# Altium PCB shifter_V2.PcbDoc (part 1 of 2)
Units mil, origin at the board's own origin, x right, y up, seen from the top; angles counter-clockwise.
Board outline 1953.14 x 1638.38 mil, 4 copper layers (Top Layer, Mid-Layer 1, Mid-Layer 2, Bottom Layer); 116 components, 104 nets, 449 pads, 247 vias.
Unrouted connection lines stored in the file: 152.
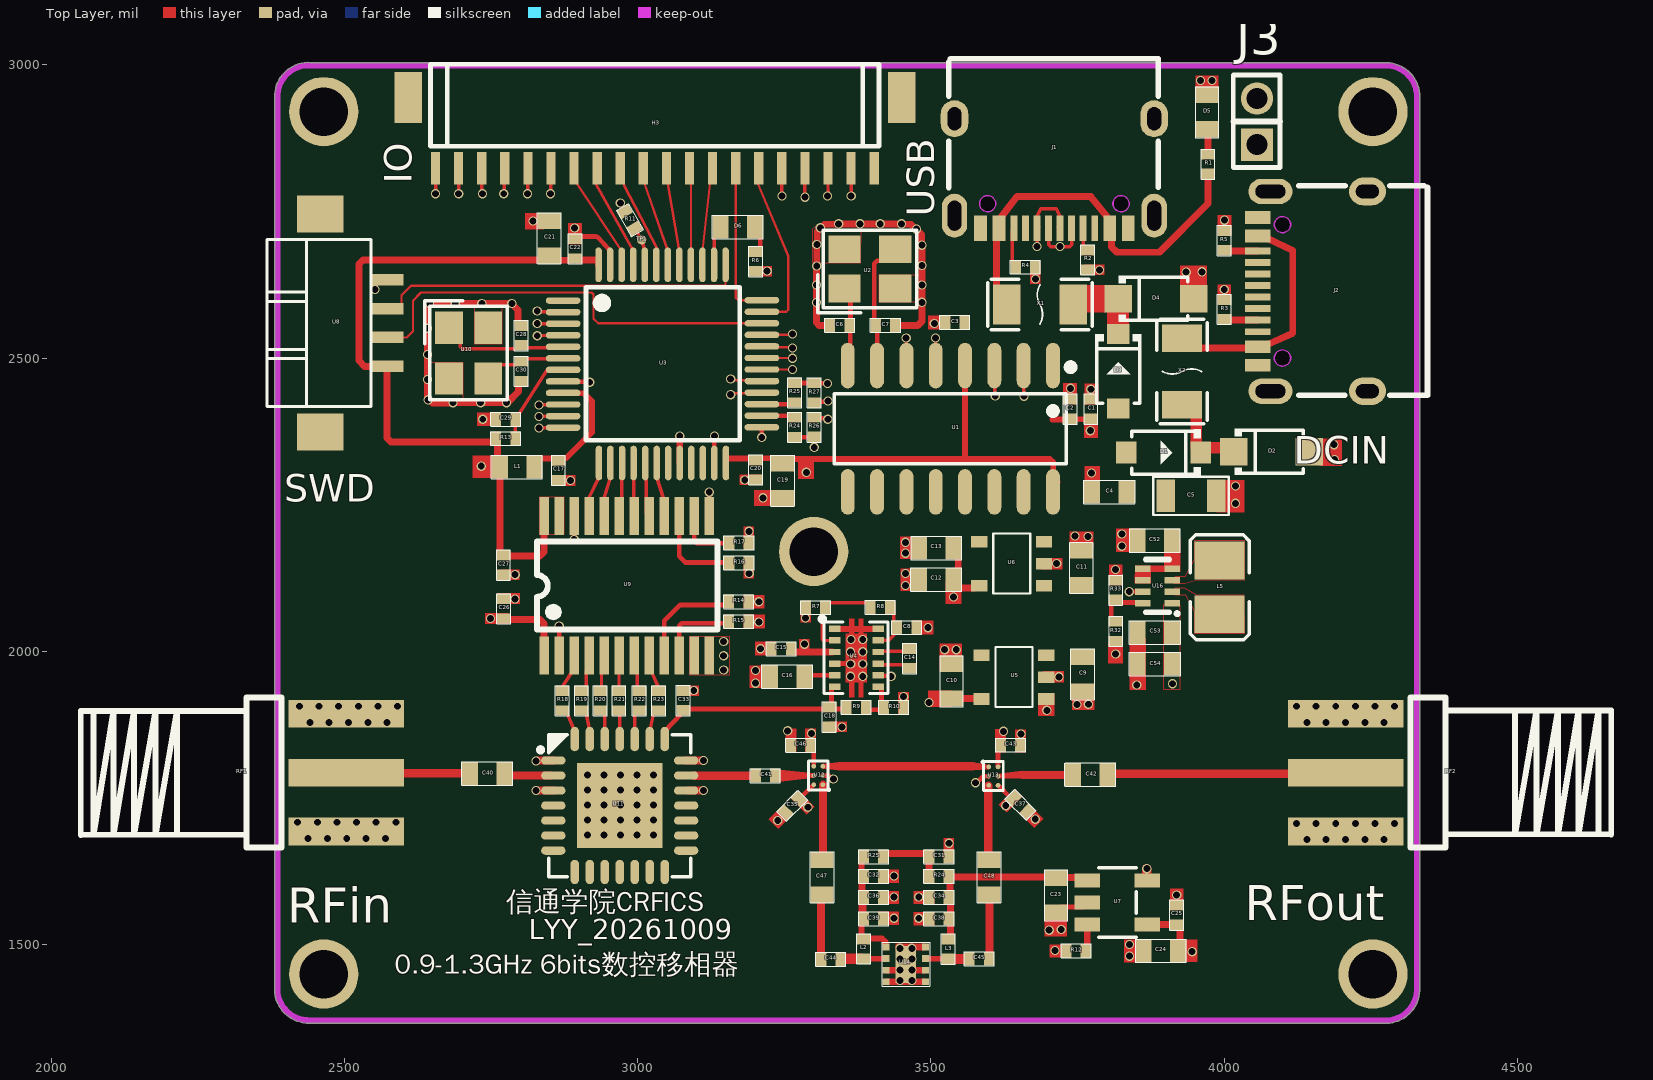
[diagram p0: Top Layer view]
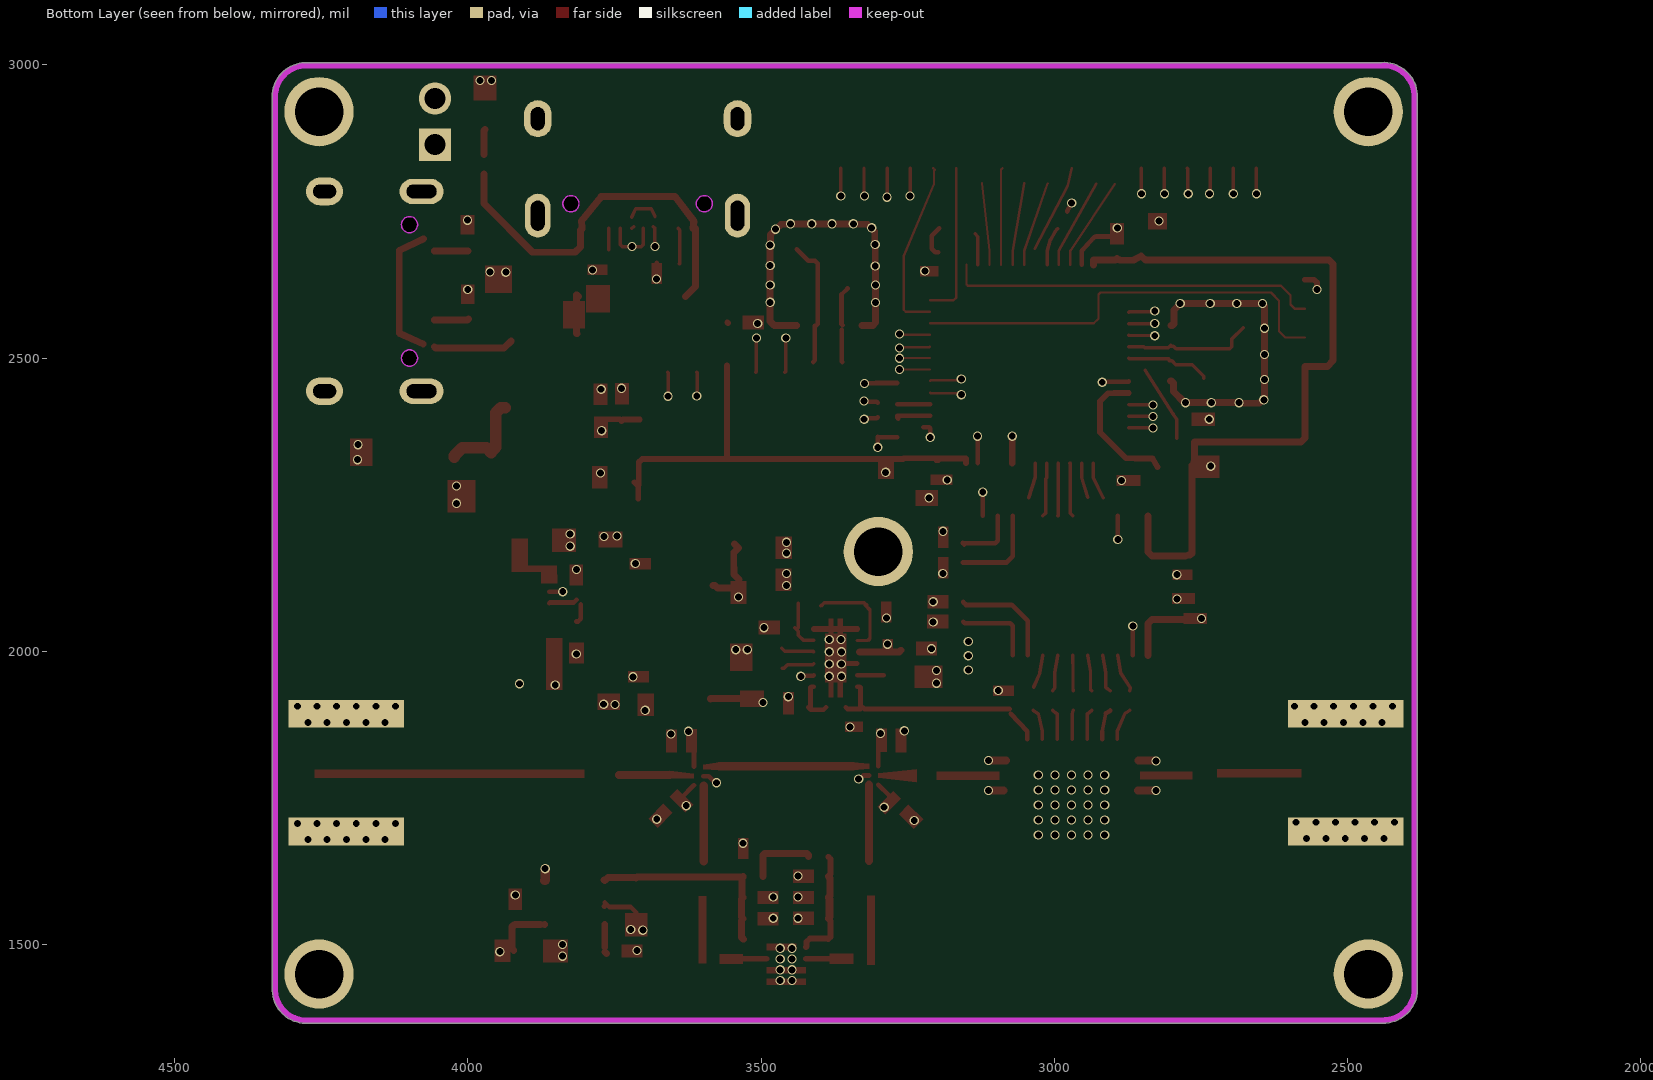
[diagram p1: Bottom Layer view, seen from below]
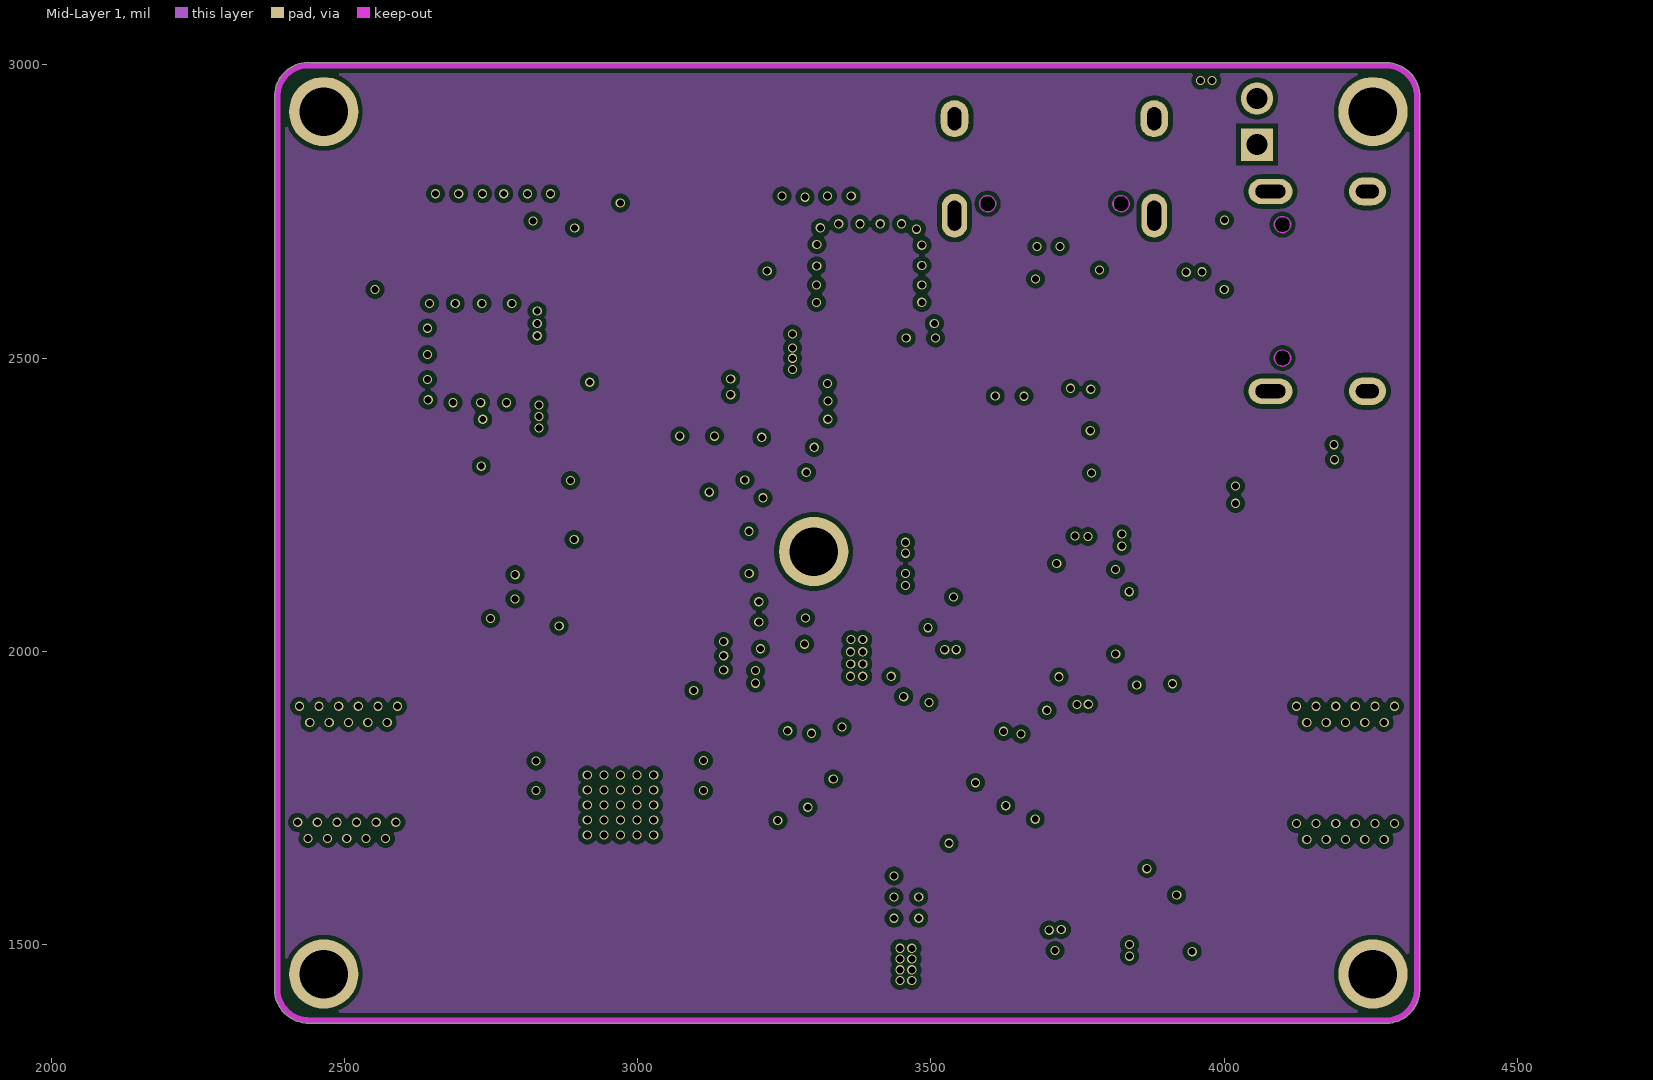
[diagram p2: Mid-Layer 1]
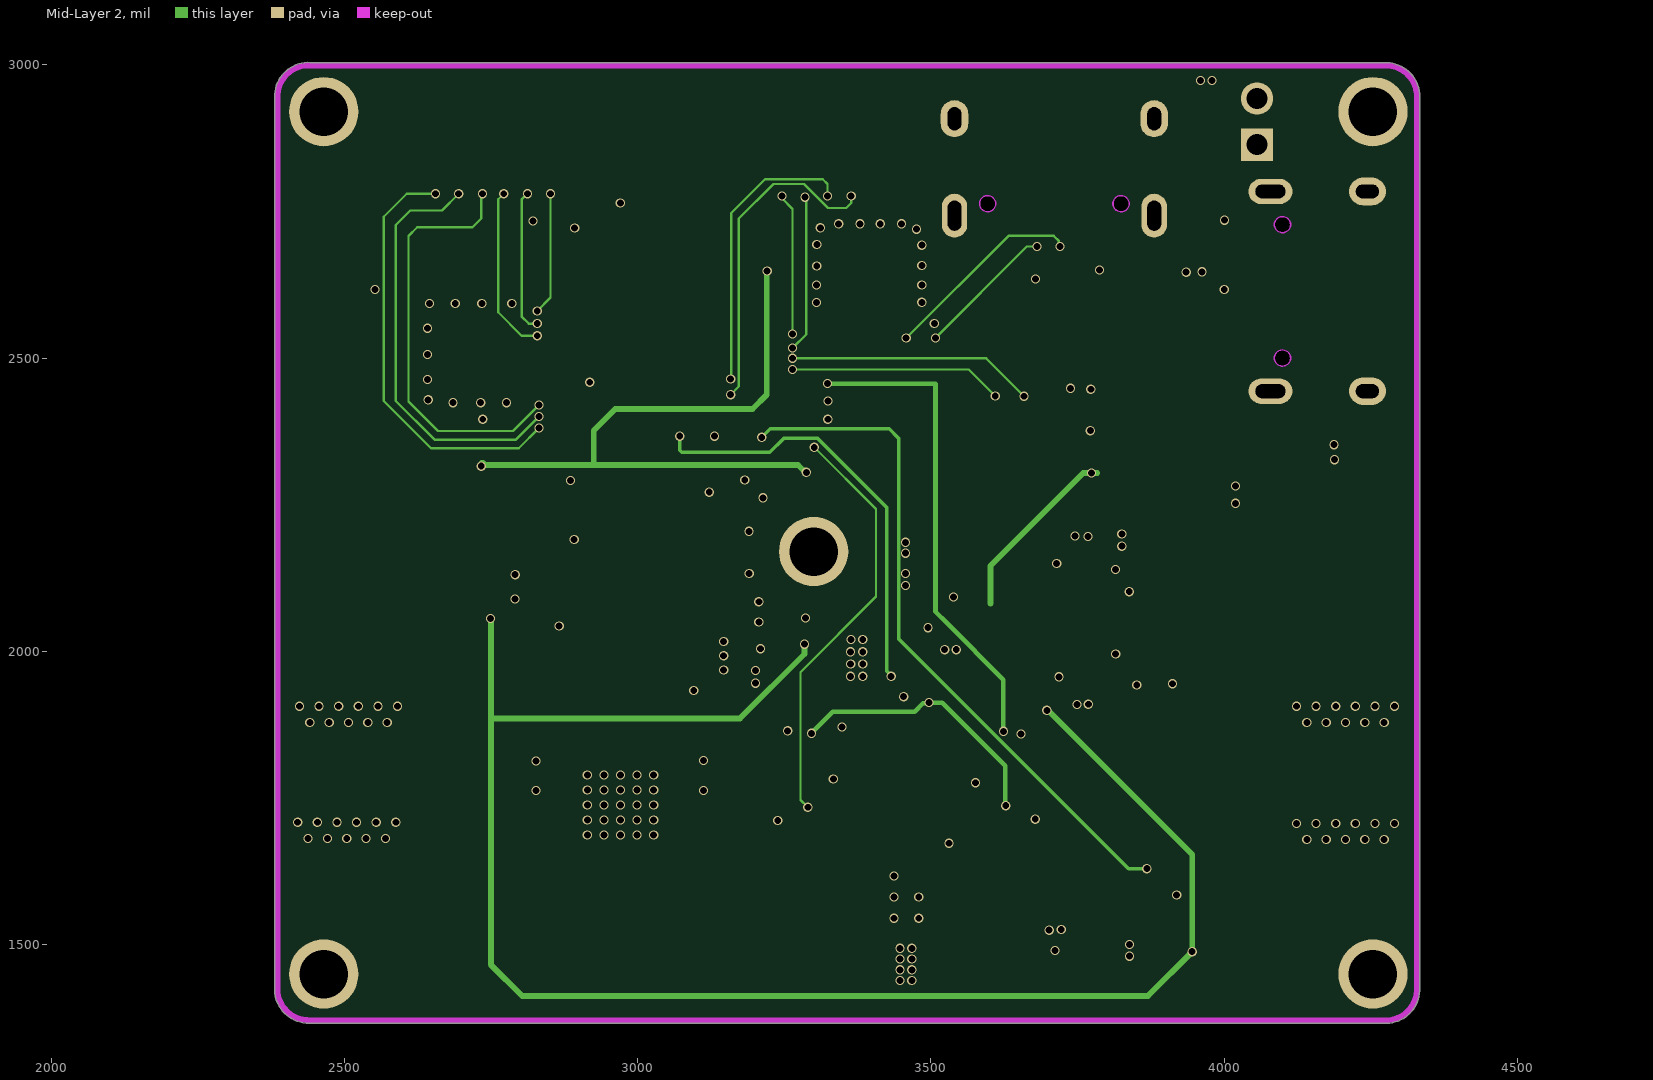
[diagram p3: Mid-Layer 2]

## Layer stack, top to bottom
Top Solder: solder mask 0.4, Solder Resist, Dk 3.5
Top Layer: signal copper 1.4
Dielectric 1: dielectric 12.6, FR-4, Dk 4.8
Mid-Layer 1: signal copper 1.4
Dielectric3: dielectric 12.6, FR-4, Dk 4.8
Mid-Layer 2: signal copper 1.4
Dielectric2: dielectric 12.6, FR-4, Dk 4.8
Bottom Layer: signal copper 1.4
Bottom Solder: solder mask 0.4, Solder Resist, Dk 3.5

## Board outline
2380.62,1426.85 ccw(c2438.63,1423.93) 2433.39,1366.08 2435.11,1365.77 4271.71,1365.77 4272.62,1365.64 ccw(c4275.54,1423.66) 4333.55,1420.73 4333.56,1420.98 4333.56,2941.91 4333.76,2945.74 ccw(c4275.68,2945.74) 4282.76,3003.39 4280.31,3004.03 2441.57,3004.03 ccw(c2438.77,2946.01) 2380.82,2949.99 2380.64,2948.68

## Design rules (kind name [scope] priority, off if disabled: settings)
Clearance Clearance_1 [InNamedPolygon('NONET_L-01_P-TOP')] p1: gap=22.83 ignorepadtopadclearanceinfootprint=FALSE except(0: Arc-Text Arc-Hole Track-Text Track-Hole SMDPad-Text SMDPad-Hole THPad-Text THPad-Hole Via-Text Via-Hole Fill-Text Fill-Hole Poly-Text Poly-Hole Region-Text Region-Hole Text-Text Text-Hole; 15.75: Arc-Arc Arc-Track Arc-SMDPad Arc-THPad Arc-Via Track-Track Track-SMDPad Track-THPad Track-Via SMDPad-SMDPad SMDPad-THPad SMDPad-Via THPad-THPad THPad-Via Via-Via; 27.56: Arc-Fill Arc-Poly Arc-Region Track-Fill Track-Poly Track-Region)
Clearance Clearance_2 [InNamedPolygon('NONET_L-01_P-002')] p2: gap=27.56 ignorepadtopadclearanceinfootprint=FALSE except(0: Arc-Hole Track-Hole SMDPad-Hole THPad-Hole Via-Hole Fill-Hole Poly-Hole Region-Hole Text-Hole; 11.81: Arc-Via Track-Via SMDPad-Via THPad-Via Via-Via)
Clearance GND_Bottom [InNamedPolygon('GND_Bottom')] p3: gap=23.62 ignorepadtopadclearanceinfootprint=TRUE
Clearance Ch341_3V3 [InNamedPolygon('CH341_3V3')] p4: gap=19.68 ignorepadtopadclearanceinfootprint=TRUE
Clearance VSS [InNamedPolygon('VSS')] p5: gap=7.87 ignorepadtopadclearanceinfootprint=TRUE except(23.62: Arc-Fill Arc-Poly Arc-Region Track-Fill Track-Poly Track-Region Fill-Fill Fill-Poly Fill-Region Poly-Poly Poly-Region Region-Region)
Clearance GND [InNamedPolygon('GND_Ploy')] p6: gap=15.75 ignorepadtopadclearanceinfootprint=TRUE except(31.5: Arc-Fill Arc-Poly Arc-Region Track-Fill Track-Poly Track-Region Fill-Fill Fill-Poly Fill-Region Poly-Poly Poly-Region Region-Region)
Clearance DC_GND [InNamedPolygon('DC_Ploy')] p7: gap=15.75 ignorepadtopadclearanceinfootprint=TRUE except(31.5: Arc-Fill Arc-Poly Arc-Region Track-Fill Track-Poly Track-Region Fill-Fill Fill-Poly Fill-Region Poly-Poly Poly-Region Region-Region)
Clearance LNA [InNamedPolygon('LNA')] p8: gap=4.02 ignorepadtopadclearanceinfootprint=TRUE except(7.87: Arc-Arc Arc-Track Track-Track SMDPad-Fill SMDPad-Poly SMDPad-Region THPad-Fill THPad-Poly THPad-Region; 31.5: Arc-Fill Arc-Poly Arc-Region Track-Fill Track-Poly Track-Region Via-Fill Via-Poly Via-Region Fill-Fill Fill-Poly Fill-Region Poly-Poly Poly-Region Region-Region)
Clearance Ploy [InPolygon] p9: gap=7.87 ignorepadtopadclearanceinfootprint=TRUE
Clearance Diff [InNetClass('Diff')] p10: gap=6 ignorepadtopadclearanceinfootprint=TRUE
Clearance [All] p11: gap=3.94 ignorepadtopadclearanceinfootprint=TRUE except(4.02: SMDPad-SMDPad; 7.99: SMDPad-THPad)
ComponentClearance [All] p1: gap=3.94 collisioncheckmode=3 verticalgap=3.94 showdistances=FALSE donotcheckwithout3dbody=TRUE
DiffPairsRouting [All] p1: maxlimit=393.7 minlimit=3.94 mostfreqgap=7 toplayer_minwidth=5.04 toplayer_maxwidth=40 toplayer_prefwidth=16.6 midlayer1_minwidth=5.04 midlayer1_maxwidth=40 midlayer1_prefwidth=16.6 midlayer2_maxgap=10 midlayer2_minwidth=5.04 midlayer2_maxwidth=15 midlayer2_prefwidth=11.42 bottomlayer_minwidth=5.04 bottomlayer_maxwidth=40 bottomlayer_prefwidth=16.6 maxuncoupledlength=500
HoleSize [All] p1: absolutevalues=TRUE maxlimit=196.85 minlimit=1 maxpercent=80.000 minpercent=20.000
HoleToHoleClearance [All] p1: gap=0 allowstackedmicrovias=TRUE
MatchedLengths [InNetClass('DRM')] p1: tolerance=50 checknetsindiffpair=FALSE checkdiffpairvsdiffpair=TRUE checkxsignals=TRUE checkothers=TRUE
MinimumSolderMaskSliver [All] p1: minsoldermaskwidth=0
PlaneConnect [All] p1: planeconnectstyle=Direct reliefexpansion=20 reliefentries=4 reliefconductorwidth=10 reliefairgap=10
PolygonConnect [All] p1: connectstyle=Direct reliefconductorwidth=10 reliefentries=4 polygonreliefangle="90 Angle" airgapwidth=10
RoutingVias [All] p1: holewidth=28 width=50 viastyle="Through Hole" minholewidth=7.87 minwidth=3.94 maxholewidth=94.49 maxwidth=196.85
SilkToSilkClearance [All] p1: silktosilkclearance=0
SilkToSolderMaskClearance [IsPad] p1: minsilkscreentomaskgap=0 clearancetoexposedcopper=TRUE
SolderMaskExpansion [IsVia] p1: expansion=4 istentingtop=TRUE
SupplyNets "Schematic Supply Nets_1" [InNet('GND')] p1: voltage=0.000
SupplyNets "Schematic Supply Nets" [InNet('3V3')] p2: voltage=0.000
Width [All] p1: maxlimit=196.85 minlimit=3.94 preferedwidth=3.94 midlayer1_maxwidth=78.74 midlayer2_maxwidth=10 bottomlayer_maxwidth=10 minimp=50.000000 maximp=50.000000 favimp=50.000000
22 further rules are at their usual default settings.

## Components (designator, comment, footprint, x,y, rotation, side; value= is the part's Value field where it differs from the comment)
C1 "0.1uF" 0402_Z 3772.63,2412.91 r90 top value="20pF  NP0"
C2 "0.1uF" 0402_Z 3737.16,2412.91 r90 top value="20pF  NP0"
C3 "10nF" 0402_Z 3541.13,2560.63 r180 top value="20pF  NP0"
C4 "10uF" 0603_Z 3803.8,2272.45 r180 top value="20pF  NP0"
C5 "47uF" 0805 3943.44,2265.06 r180 top value="20pF  NP0"
C6 "33pF" 0402_Z 3343.94,2556.21 r0 top value="20pF  NP0"
C7 "33pF" 0402_Z 3422.72,2555.73 r180 top value="20pF  NP0"
C8 "2.2uF" 0402_Z 3458.95,2040.19 r180 top value="20pF  NP0"
C9 "1uF" 0603_Z 3759.33,1961.45 r90 top value=100pF
C10 "1uF" 0603_Z 3534.25,1948.54 r270 top value=100pF
C11 "1uF" 0603_Z 3755.96,2141.64 r270 top value=100pF
C12 "100nF" 0603_Z 3509.64,2121.75 r0 top value=100pF
C13 "1uF" 0603_Z 3509.64,2175.89 r0 top value=100pF
C14 "1uF" 0402_Z 3463.97,1987.92 r270 top value="20pF  NP0"
C15 "2.2uF" 0402_Z 3244.93,2004.18 r180 top value="20pF  NP0"
C16 "4.7uF" 0603_Z 3254.57,1957.33 r180 top value="20pF  NP0"
C17 "1uF" 0402_Z 2864.96,2308.78 r270 top value="20pF  NP0"
C18 "2.2uF" 0402_Z 3326.57,1887.52 r90 top value="20pF  NP0"
C19 "4.7uF" 0603_Z 3247.19,2291.59 r90 top value="20pF  NP0"
C20 "100nF" 0402_Z 3200.97,2308.92 r90 top value="20pF  NP0"
C21 "4.7uF" 0603_Z 2849.53,2704.74 r90 top value="20pF  NP0"
C22 "100nF" 0402_Z 2892.92,2686.18 r90 top value="20pF  NP0"
C23 "1uF" 0603_Z 3712.4,1583.39 r270 top value=100pF
C24 "10uF" 0603_Z 3891.54,1489.88 r180 top value=100pF
C25 "0.1uF" 0402_Z 3919.09,1549.92 r90 top value=100pF
C26 "100nF" 0402_Z 2771.68,2072.91 r270 top value="20pF  NP0"
C27 "100nF" 0402_Z 2770.69,2146.73 r90 top value="20pF  NP0"
C28 "10pF" 0402_Z 2801.47,2538.9 r270 top value="20pF  NP0"
C29 "1uF" 0402_Z 2775.04,2395.61 r180 top value="20pF  NP0"
C30 "10pF" 0402_Z 2800.98,2477.09 r90 top value="20pF  NP0"
C31 "100 pF" 0402_Z 3514.01,1649.5 r180 top value=100pF
C32 "100nF" 0402_Z 3401.8,1616.52 r0 top value=100pF
C33 "10nF" 0402_Z 3077.78,1916.42 r270 top value="20pF  NP0"
C34 "100nF" 0402_Z 3514.01,1580.1 r180 top value=100pF
C35 "100 pF" 0402_Z 3263.83,1736.59 r225 top value=100pF
C36 "1nF" 0402_Z 3401.8,1580.58 r0 top value=100pF
C37 "100 pF" 0402_Z 3652.25,1738.34 r315 top value=100pF
C38 "100 pF" 0402_Z 3514.01,1543.68 r180 top value=100pF
C39 "100 pF" 0402_Z 3401.8,1544.16 r0 top value=100pF
C40 "100nF" 0603_Z 2743.9,1791.06 r0 top value="20pF  NP0"
C41 "100 pF" 0402_Z 3217.32,1788.11 r0 top value=100pF
C42 "100nF" 0603_Z 3772.44,1789.09 r0 top value="20pF  NP0"
C43 "100 pF" 0402_Z 3635.45,1840.28 r0 top value=100pF
C44 "100 pF" 0402_Z 3328.97,1474.78 r0 top value=100pF
C45 "100 pF" 0402_Z 3581.92,1475.77 r0 top value=100pF
C46 "100 pF" 0402_Z 3278.32,1839.79 r180 top value=100pF
C47 "NC" 0603_Z 3314.76,1614.88 r90 top
C48 "NC" 0603_Z 3599.21,1614.88 r90 top
C52 "22uF" 0603_Z 3881.15,2189.79 r180 top value="20pF  NP0"
C53 "47uF" 0603_Z 3882.25,2031.75 r0 top value="20pF  NP0"
C54 "22uF" 0603_Z 3882.25,1977.62 r0 top value="20pF  NP0"
D1 "B5819W" BW5819W 3896.56,2338.75 r0 top
D2 "SMF5.0A" SMF5.0A 4080.92,2340.11 r0 top
D3 "B5819W" BW5819W 3819.46,2477.51 r90 top
D4 "SMF5.0A" SMF5.0A 3883.66,2601.1 r0 top
D5 "LED0" 0603_Z 3970.28,2919.02 r270 top
D6 "LED1" 0603_Z 3171.06,2723.15 r0 top
H3 "HEADER20" Header20 3038.19,2929.84 r90 top
J1 "typec_16pin" TYPEC_16PIN 3705.44,2849.69 r180 top
J2 "typec_16pin" TYPEC_16PIN 4185.83,2618.82 r90 top
J3 "2pin" H2-2mm 4056,2903.37 r90 top
L1 "bead" 0603_Z 2793.6,2314.55 r180 top value=33nH
L2 "18nH" 0402_Z 3385.63,1492.83 r270 top value=10mH
L3 "47nH" 0402_Z 3529.76,1492.5 r270 top value=10mH
L5 "1uH" L1008 3994.64,2108.53 r270 top
R1 "10k" 0402_Z 3972.24,2830.43 r90 top
R2 "5.1k" 0402_Z 3767.41,2667.09 r90 top
R3 "5.1k" 0402_Z 4000.54,2583.39 r270 top
R4 "5.1k" 0402_Z 3661.44,2655.09 r180 top
R5 "5.1k" 0402_Z 4000.54,2700.74 r270 top
R6 "10k" 0402_Z 3200.95,2664.28 r90 top
R7 "310k" 0402_Z 3302.95,2074.95 r0 top
R8 "100k" 0402_Z 3413.25,2075.15 r0 top
R9 "100k" 0402_Z 3372.83,1904.25 r180 top
R10 "310k" 0402_Z 3436.81,1904.25 r180 top
R11 "10k" 0402_Z 2986.02,2734.96 r120 top
R12 "38k" 0402_Z 3747.83,1488.9 r180 top value=1K
R13 "10k" 0402_Z 2774.33,2363.13 r0 top
R14 "0" 0402_Z 3172.4,2084.49 r180 top
R15 "0" 0402_Z 3172.4,2050.43 r180 top
R16 "10k" 0402_Z 3172.4,2151.05 r0 top
R17 "10k" 0402_Z 3172.4,2185.1 r0 top
R18 "22" 0402_Z 2871.09,1915.43 r90 top
R19 "22" 0402_Z 2903.96,1915.43 r90 top
R20 "22" 0402_Z 2935.85,1915.43 r90 top
R21 "22" 0402_Z 2967.74,1915.43 r90 top
R22 "22" 0402_Z 3002.58,1915.43 r90 top
R23 "22" 0402_Z 3035.46,1915.43 r90 top
R24 "6.5k" 0402_Z 3514.01,1616.03 r180 top value=1K
R24 "1k" 0402_Z 3267.52,2381.61 r90 top
R25 "50" 0402_Z 3401.8,1649.98 r0 top value=1K
R25 "1k" 0402_Z 3268,2441.3 r270 top
R26 "2k" 0402_Z 3301.24,2382.6 r270 top
R27 "2k" 0402_Z 3300.76,2440.31 r90 top
R32 "806K" 0402_Z 3814.52,2033.73 r90 top
R33 "91K" 0402_Z 3814.52,2104 r90 top
RF1 "BWIPX-1-001E" SMA-SMD_BWSMA-KE-P001 2502.76,1793.03 r180 top
RF2 "BWIPX-1-001E" SMA-SMD_BWSMA-KE-P001 4207.48,1793.03 r0 top
TP1 "TP_P" TP_0.8 3006.69,2701.5 r45 top
U1 "CH340G" CH340G 3533.1,2379.48 r180 top
U2 "12MHz" CRYSTAL-SMD_4P-L3.2-W2.5-BL 3395.79,2652.13 r0 top
U3 "CS32F030C8T6" LQPF48 3042.26,2490.02 r270 top
U4 "LM27762DSSR" LM27762 3372.83,1988.9 r270 top
U5 "SGM2036-2.8V" SOT-23-5 3641.46,1955.99 r180 top
U6 "SGM2036-3.3YN5G/TR" SOT-23-5 3637.4,2149.5 r180 top
U7 "SGM2576" SGM2576 3817.72,1571.58 r0 top
U8 "HDGC1251WR-4P" J4_1.25 2515.55,2559.76 r270 top
U9 "AiP74LVC8T245TA24.TR" AIP74LVC8T245TA24.TR 2981.1,2111.93 r0 top
U10 "8MHz" CRYSTAL-SMD_4P-L3.2-W2.5-BL 2711.42,2508.58 r270 top
U11 "XT3301Q6" XT3301Q6 2969.29,1736.93 r270 top
U12 "MXD8625C" MXD8625C 3295,1794.29 r0 top
U13 "MXD8625C" MXD8625C 3619.4,1780.85 r180 top
U14 "FW1103" FW1103W 3456.92,1465.93 r270 top
U16 "TPS631000" TPS631000DRLR 3886.37,2111.49 r90 top
X1 "Fuse" F1206 3685.83,2591.26 r180 top
X2 "Fuse" F1206 3928.24,2477.16 r90 top

## Footprints (in the part's own frame and the unit in brackets; to place one, negate y for a bottom-side part, rotate by r counter-clockwise, add the part's x,y. Pads: shape width x height; smd on the part's side, far side on the other; paste and mask are expansions set on the pad)
0402_Z [mm]
  rect 0.45x0.6 smd mask+0: 1(0.434,-0.006) 2(-0.416,-0.006)
  silkscreen extent -0.64,-0.31 0.66,0.29, body extent -0.41,-0.31 0.44,0.29, height 0.25
0603_Z [mm]
  rect 0.7x1 smd mask+0: 1(0.735,0.013) 2(-0.765,0.013)
  silkscreen extent -1.12,-0.49 1.09,0.52
0805 [mm]
  rect 0.8x1.4 smd: 1(-1.1,0) 2(1.1,0)
  silkscreen extent -1.63,-0.83 1.64,0.83
AIP74LVC8T245TA24.TR [mm]
  rect 0.4x1.65 smd: 1(-3.575,-3.023) 2(-2.925,-3.023) 3(-2.275,-3.023) 4(-1.625,-3.023) 5(-0.975,-3.023) 6(-0.325,-3.023) 7(0.325,-3.023) 8(0.975,-3.023) 9(1.625,-3.023) 10(2.275,-3.023) 11(2.925,-3.023) 12(3.575,-3.023) 13(3.575,3.023) 14(2.925,3.023) 15(2.275,3.023) 16(1.625,3.023) 17(0.975,3.023) 18(0.325,3.023) 19(-0.325,3.023) 20(-0.975,3.023) 21(-1.625,3.023) 22(-2.275,3.023) 23(-2.925,3.023) 24(-3.575,3.023)
  silkscreen extent -3.89,-1.91 3.94,1.91
BW5819W [mm] "肖特基二极管"
  rect 0.88x0.96 smd: 1(-1.61,0) 2(1.61,0)
  silkscreen extent -1.38,-1 1.6,1
CH340G [mil]
  oval 23.7x77.6 smd: 1(-175,-107.7) 2(-125,-107.7) 3(-75,-107.7) 4(-25,-107.7) 5(25,-107.7) 6(75,-107.7) 7(125,-107.7) 8(175,-107.7) 9(175,107.7) 10(125,107.7) 11(75,107.7) 12(25,107.7) 13(-25,107.7) 14(-75,107.7) 15(-125,107.7) 16(-175,107.7)
  silkscreen extent -211,-111 198,60
CRYSTAL-SMD_4P-L3.2-W2.5-BL [mm]
  rect 1.4x1.2 smd paste+0 mask+0.051: 1(-1.1,-0.85) 2(1.1,-0.85) 3(1.1,0.85) 4(-1.1,0.85)
  silkscreen extent -2.26,-1.91 2.03,1.68
F1206 [mm] "保险丝"
  rect 1.19x1.728 smd paste+0 mask+0.051: 1(-1.445,0) 2(1.445,0)
  silkscreen extent -2.27,-1.09 2.27,1.09
FW1103W [mm]
  rect 1.6x0.9 smd mask+0: 0(0,0)
  rect 0.3x0.3 smd mask+0: 1(-0.75,-0.85) 2(-0.25,-0.85) 3(0.25,-0.85) 4(0.75,-0.85) 5(0.75,0.85) 6(0.25,0.85) 7(-0.25,0.85) 8(-0.75,0.85)
  round 0.1 on Top Overlay mask+0: ""(-1.036,-1.113)
  Top Layer region: 0.1,-0.85 0.4,-0.85 0.4,0.85 0.1,0.85
  Top Layer region: -0.901,-0.45 -0.618,-0.45 -0.618,0.45 -0.901,0.45
  Top Layer region: -0.901,-0.45 -0.601,-0.45 -0.601,0.85 -0.901,0.85
  Top Layer region: 0.615,-0.45 0.898,-0.45 0.898,0.451 0.615,0.451
  Top Layer region: 0.6,-0.85 0.9,-0.85 0.9,0.85 0.6,0.85
  silkscreen extent -0.96,-1.03 0.94,1.03
H2-2mm [mm]
  rect 1.4x1.4 hole 0.9: 1(-1,0)
  round 1.4 hole 0.9: 2(1,0)
  silkscreen extent -1.99,-1 2.02,1.03
Header20 [mm]
  rect 1.4x0.4 smd: 1(-2.692,9.73) 2(-2.692,8.73) 3(-2.692,7.73) 4(-2.692,6.73) 5(-2.692,5.73) 6(-2.692,4.73) 7(-2.692,3.73) 8(-2.692,2.73) 9(-2.692,1.73) 10(-2.692,0.73) 11(-2.692,-0.27) 12(-2.692,-1.27) 13(-2.692,-2.27) 14(-2.692,-3.27) 15(-2.692,-4.27) 16(-2.692,-5.27) 17(-2.692,-6.27) 18(-2.692,-7.27) 19(-2.692,-8.27) 20(-2.692,-9.27)
  rect 2.2x1.2 smd: 21(0.37,-10.47) 22(0.37,10.913)
  silkscreen extent -1.74,-9.48 1.81,9.95
J4_1.25 [mm]
  rect 0.5x1.4 smd: 1(-1.875,1.45) 2(-0.625,1.45) 3(0.625,1.45) 4(1.875,1.45)
  rect 1.6x2 smd: 5(-4.72,-1.45) 6(4.72,-1.45)
  silkscreen extent -3.62,-3.75 3.61,0.75
L1008 [mm]
  rect 1.635x2.16 smd paste-100 mask+0.051: 1(-1.18,-0.067) 2(1.155,-0.067)
  silkscreen extent -2.29,-1.34 2.26,1.23
LM27762 [mil]
  rect 11x19.7 smd: 1(-49.21,-37) 2(-29.53,-37) 3(-9.84,-37) 4(9.84,-37) 5(29.53,-37) 6(49.21,-37) 7(49.21,37) 8(29.53,37) 9(9.84,37) 10(-9.84,37) 11(-29.53,37) 12(-49.21,37)
  round 1 smd: 13(0,0)
  Top Layer region: -41.34,17.72 -41.34,11.81 -66.93,11.81 -66.93,3.94 -41.34,3.94 -41.34,-3.94 -66.93,-3.94 -66.93,-11.81 -41.34,-11.81 -41.34,-17.72 41.34,-17.72 41.34,-11.81 66.93,-11.81 66.93,-3.94 41.34,-3.94 41.34,3.94 66.93,3.94 66.93,11.81 41.34,11.81 41.34,17.72 -41.34,17.72
  silkscreen extent -69,-61 61,54
LQPF48 [mm]
  oval 0.28x1.5 smd: 1(-2.743,-4.305) 2(-2.243,-4.305) 3(-1.742,-4.305) 4(-1.242,-4.305) 5(-0.742,-4.305) 6(-0.241,-4.305) 7(0.257,-4.305) 8(0.757,-4.305) 9(1.257,-4.305) 10(1.758,-4.305) 11(2.258,-4.305) 12(2.758,-4.305) 25(2.743,4.305) 26(2.243,4.305) 27(1.742,4.305) 28(1.242,4.305) 29(0.742,4.305) 30(0.241,4.305) 31(-0.257,4.305) 32(-0.757,4.305) 33(-1.257,4.305) 34(-1.758,4.305) 35(-2.258,4.305) 36(-2.758,4.305)
  oval 1.5x0.28 smd: 13(4.293,-2.756) 14(4.293,-2.256) 15(4.293,-1.755) 16(4.293,-1.255) 17(4.293,-0.754) 18(4.293,-0.254) 19(4.293,0.244) 20(4.293,0.744) 21(4.293,1.245) 22(4.293,1.745) 23(4.293,2.245) 24(4.293,2.746) 37(-4.293,2.731) 38(-4.293,2.23) 39(-4.293,1.73) 40(-4.293,1.229) 41(-4.293,0.729) 42(-4.293,0.229) 43(-4.293,-0.269) 44(-4.293,-0.77) 45(-4.293,-1.27) 46(-4.293,-1.77) 47(-4.293,-2.271) 48(-4.293,-2.771)
  silkscreen extent -3.33,-3.31 3.3,3.34
MXD8625C [mil]
  round 8 smd mask+3: 1(20.75,-21.93) 2(20.75,-6.18) 3(20.75,9.57) 4(5,9.57) 5(5,-6.18) 6(5,-21.93)
  silkscreen extent -4,-32 33,18
SGM2576 [mm] "功率开关"
  rect 1.1x0.6 smd paste+0 mask+0.05: 1(-1.3,0.95) 2(-1.3,0) 3(-1.3,-0.95) 4(1.3,-0.95) 5(1.3,0.95)
  silkscreen extent -0.81,-1.51 0.82,1.51
SMA-SMD_BWSMA-KE-P001 [mm]
  rect 5x1.2 smd mask+0.051: 1(0,0) 2(0,2.55) 3(0,-2.55)
  rect 5x1.2 smd far side mask+0.051: 3(0,2.55) 4(0,-2.55)
  silkscreen extent 2.79,-3.25 11.5,3.25
SMF5.0A [mm]
  rect 1.2x1.2 smd: 1(-1.635,0) 2(1.635,0)
  silkscreen extent -1.6,-1 1.38,1
SOT-23-5 [mm]
  rect 0.7x0.5 smd: 1(-1.4,0.95) 2(-1.4,0) 3(-1.4,-0.95) 4(1.4,-0.95) 5(1.4,0.95)
  silkscreen extent -0.81,-1.3 0.79,1.3
TP_0.8 [mm]
  round 0.4 smd: 1(0,0)
TPS631000DRLR [mm] "升降压DCDC"
  rect 0.28x0.68 smd: 1(-0.75,-0.64) 2(-0.25,-0.64) 3(0.25,-0.64) 4(0.75,-0.64) 5(0.75,0.64) 6(0.25,0.64) 7(-0.25,0.64) 8(-0.75,0.64)
  silkscreen extent -1.27,-0.93 1.14,0.51
TYPEC_16PIN [mm]
  oval 1.2x1.6 hole 0.6 slot 1 at 90 deg paste-2539.97 mask+0.05: 13(-4.452,-1.486) 14(4.198,-1.486)
  oval 1.1x1.9 hole 0.6 slot 1.3 at 90 deg paste-2539.97 mask+0.05: 13(-4.452,2.714) 14(4.198,2.714)
  rect 0.55x1.1 smd paste+0 mask+0.05: A1B12(-3.327,3.264) A4B9(-2.527,3.264) B1A12(3.073,3.264) B4A9(2.273,3.264)
  rect 0.3x1.1 smd paste+0 mask+0.05: A5(-1.377,3.264) A6(-0.377,3.264) A7(0.123,3.264) A8(1.123,3.264) B5(1.623,3.264) B6(0.623,3.264) B7(-0.877,3.264) B8(-1.877,3.264)
  Keep-Out Layer board cut-out: 3.113,2.194 3.113,2.124 3.06,1.996 2.961,1.897 2.833,1.844 2.694,1.844 2.565,1.897 2.466,1.996 2.413,2.124 2.413,2.194 2.413,2.264 2.466,2.392 2.565,2.491 2.694,2.544 2.833,2.544 2.961,2.491 3.06,2.392 3.113,2.264 3.113,2.194 3.113,2.194
  Keep-Out Layer board cut-out: -2.667,2.194 -2.667,2.124 -2.72,1.996 -2.819,1.897 -2.947,1.844 -3.087,1.844 -3.215,1.897 -3.314,1.996 -3.367,2.124 -3.367,2.194 -3.367,2.264 -3.314,2.392 -3.215,2.491 -3.087,2.544 -2.947,2.544 -2.819,2.491 -2.72,2.392 -2.667,2.264 -2.667,2.194 -2.667,2.194
  Keep-Out Layer circle w0.003: c2.763,2.194 r0.35
  Keep-Out Layer circle w0.003: c-3.017,2.194 r0.35
  Keep-Out Layer region: 3.113,2.194 3.104,2.116 3.078,2.042 3.037,1.976 2.981,1.92 2.915,1.879 2.841,1.853 2.763,1.844 2.685,1.853 2.611,1.879 2.545,1.92 2.489,1.976 2.448,2.042 2.422,2.116 2.413,2.194 2.422,2.272 2.448,2.346 2.489,2.412 2.545,2.468 2.611,2.509 2.685,2.535 2.763,2.544 2.841,2.535 2.915,2.509 2.981,2.468 3.037,2.412 3.078,2.346 3.104,2.272 3.113,2.194
  Keep-Out Layer region: 3.113,2.194 3.113,2.124 3.06,1.996 2.961,1.897 2.833,1.844 2.694,1.844 2.565,1.897 2.466,1.996 2.413,2.124 2.413,2.194 2.413,2.264 2.466,2.392 2.565,2.491 2.694,2.544 2.833,2.544 2.961,2.491 3.06,2.392 3.113,2.264 3.113,2.194 3.113,2.194
  Keep-Out Layer region: -2.667,2.194 -2.676,2.116 -2.702,2.042 -2.743,1.976 -2.799,1.92 -2.865,1.879 -2.939,1.853 -3.017,1.844 -3.095,1.853 -3.169,1.879 -3.235,1.92 -3.291,1.976 -3.332,2.042 -3.358,2.116 -3.367,2.194 -3.358,2.272 -3.332,2.346 -3.291,2.412 -3.235,2.468 -3.169,2.509 -3.095,2.535 -3.017,2.544 -2.939,2.535 -2.865,2.509 -2.799,2.468 -2.743,2.412 -2.702,2.346 -2.676,2.272 -2.667,2.194
  Keep-Out Layer region: -2.667,2.194 -2.667,2.124 -2.72,1.996 -2.819,1.897 -2.947,1.844 -3.087,1.844 -3.215,1.897 -3.314,1.996 -3.367,2.124 -3.367,2.194 -3.367,2.264 -3.314,2.392 -3.215,2.491 -3.087,2.544 -2.947,2.544 -2.819,2.491 -2.72,2.392 -2.667,2.264 -2.667,2.194 -2.667,2.194
  silkscreen extent -4.63,-4.09 4.45,1.49
XT3301Q6 [mm] "0.9-1.3GHz移相器"
  oval 0.364x1.055 smd paste-100 mask+0.051: 1(-1.95,-2.878) 2(-1.3,-2.878) 3(-0.65,-2.878) 4(0,-2.878) 5(0.65,-2.878) 6(1.3,-2.878) 7(1.95,-2.878) 15(1.95,2.878) 16(1.3,2.878) 17(0.65,2.878) 18(0,2.878) 19(-0.65,2.878) 20(-1.3,2.878) 21(-1.95,2.878)
  oval 1.055x0.364 smd paste-100 mask+0.051: 8(2.878,-1.95) 9(2.878,-1.3) 10(2.878,-0.65) 11(2.878,0) 12(2.878,0.65) 13(2.878,1.3) 14(2.878,1.95) 22(-2.878,1.95) 23(-2.878,1.3) 24(-2.878,0.65) 25(-2.878,0) 26(-2.878,-0.65) 27(-2.878,-1.3) 28(-2.878,-1.95)
  rect 3.7x3.7 smd paste-100 mask+0.051: 29(0,0)
  silkscreen extent -3.08,-3.53 3.08,3.08

## Part data
C1 C2 C3 C4 C5 C6 C7 C8 C14 C15 C16 C17 C18 C19 C20 C21 C22 C26 C27 C28 C29 C30 C33 C40 C42 C52 C53 C54: library part CAP, "0402"
C9 C10 C11 C12 C13 C23 C24 C25 C31 C32 C34 C35 C36 C37 C38 C39 C41 C43 C44 C45 C46: library part Cap, "Capacitor", LatestRevisionDate=17-Jul-2002, LatestRevisionNote="Re-released for DXP Platform.", PackageDescription="Radial Cap, Thru-Hole; 2 Leads; 0.3 in Pin Spacing", PackageReference=RAD-0.3, Published=8-Jun-2000, Publisher="Altium Limited"
C47 C48: library part Cap_NC
D1 D3: "肖特基二极管"
D5: "Typical INFRARED GaAs LED", LatestRevisionDate=08-Jul-2005, LatestRevisionNote="Mech Layer 1 removed.", PackageDescription="LED; 2 Leads", PackageReference=LED-0, Published=8-Jun-2000, Publisher="Altium Limited"
D6: library part LED0, "Typical INFRARED GaAs LED", LatestRevisionDate=08-Jul-2005, LatestRevisionNote="Mech Layer 1 removed.", PackageDescription="LED; 2 Leads", PackageReference=LED-0, Published=8-Jun-2000, Publisher="Altium Limited"
L1: library part INDUCTOR1_1, "INDUCTOR"
L2 L3: library part Inductor, "Inductor", Code_IEC=1005, Code_JEITA=0402, LatestRevisionDate=29-May-2009, LatestRevisionNote="IPC-7351 Footprint Added.", PackageDescription="Chip Inductor", PackageReference=0402-A, Published=8-Jun-2000, Publisher="Altium Limited"
L5: library part Inductor_7, "Inductor", Code_IEC=1005, Code_JEITA=0402, LatestRevisionDate=29-May-2009, LatestRevisionNote="IPC-7351 Footprint Added.", PackageDescription="Chip Inductor", PackageReference=0402-A, Published=8-Jun-2000, Publisher="Altium Limited"
R1 R2 R3 R4 R5 R6 R7 R8 R9 R10 R11 R13 R14 R15 R16 R17 R18 R19 R20 R21 R22 R23 R24 R25 R26 R27 R32 R33: library part Res3, "Resistor", LatestRevisionDate=04-Mar-2005, LatestRevisionNote="PCB Footprint replaced.", PackageReference=J1-0603, Published=8-Jun-2000, Publisher="Altium Limited"
R12 R24 R25: library part Res1, "Resistor", LatestRevisionDate=17-Jul-2002, LatestRevisionNote="Re-released for DXP Platform.", PackageDescription="Axial Device, Thru-Hole; 2 Leads; 0.3 in Pin Spacing", PackageReference=AXIAL-0.3, Published=8-Jun-2000, Publisher="Altium Limited"
U2 U10: library part "XTAL 3225", PCB DECAL=3225, Source_Path="E:\LI LELE\DESIGN KIT\DESIGN KIT_ESP8089_DEMO\ESP8089_DEMO.DSN"
U5: library part sgm2036
U6: library part LDO_ADJ_SGM2036, "0.8V-5V可调输出线性稳压器", Designer=U?, Device=SGM2036-3.3YN5G/TR, Symbol=SGM2036-3.3YN5G/TR
U8: library part MX1.25_弯针, "复旦微单片机程序下载接口", JLCPCB Part Class="Extended Part", LCSC Part Name="MX1.25弯针 4P", Manufacturer=HDGC(华德共创), Add into BOM=yes, Convert to PCB=yes, Datasheet=https://atta.szlcsc.com/upload/public/pdf/source/20220916/6B39EFECC0008CEF03BA0E93409F6DCC.pdf, Device=HDGC1251WR-4P, Manufacturer Part=HDGC1251WR-4P, Name=HDGC1251WR-4P, Supplier=LCSC, Supplier Footprint=直插,P=1.25mm, Supplier Part=C5175205, Symbol=HDGC1251WR-4P
U9: "具有三态输出的8位双电源转换收发器，可实现双向电平转换"
U16: "可以兼容国产芯片"
X1 X2: CURRENT=1, RESISTANCE=1m, SimulationGenericComponent=True

## Free pads (board coordinates)
  round 118.11 hole 82.68 mask+4: ""(2464.49,1449.53) ""(2464.49,2920.28) ""(3300,2170) ""(4253.74,1449.53) ""(4253.74,2920.28)

## Via types
v1: diameter 15.75, hole 11.81, Top Layer to Bottom Layer, tented both sides, 244 vias
v2: diameter 15.75, hole 11.81, Top Layer to Bottom Layer, 3 vias

## Nets (pads, with @x,y where several pads share a name; then routed paths per layer and width w, separated by ;. In a path a pad name is that pad's centre, name@x,y a point inside that pad or via, vN(x,y) a via of type N, cw(c..) or ccw(c..) an arc to the next point about the centre after c; other vN are vias at no path point)
3V3: C1.2 C2.2 C3.2 C12.1 C13.1 C19.1 C20.1 C21.2 C22.2 C27.1 L1.1 R6.2 R13.2 U1.4 U1.16 U3.24 U3.48 U6.5 U8.4 U9.23 U9.24 | length 2306.1
  Top Layer w9.84: U3.24@3150.36,2321.02 3150.36,2328.31 3150.91,2328.86 3198.34,2328.86 C20.1@3201.19,2326.01 ; C20.1@3197.89,2325.84 3201.04,2329 3256.64,2329 3257.9,2327.74 3276.69,2327.74 3283.34,2313.79 3287.45,2309.68 v1(3287.45,2305.09) ; 3287.14,2315.61 3287.14,2319.05 3296.03,2327.93 3558.1,2327.93 ; C3.2@3556.29,2559.62 C3.2@3557.51,2560.85 ; U1.4@3558.1,2487.18 3558.1,2327.99 3702.73,2327.99 3708.5,2322.22 U1.16@3708.5,2283.53 ; 3706.81,2395.2 3735.63,2395.2 3738.04,2392.8 3740.9,2395.66 3770.26,2395.66 C1.2@3773.22,2392.7 ; U1.16@3709.25,2260.13 3709.25,2281.89 U1.16@3715.65,2288.29
  Top Layer w11.81: U8.4@2572.61,2485.94 2534.25,2485.94 2524.41,2495.79 2524.41,2660.23 2531.33,2667.15 2844.48,2667.15 2851.66,2674.32 2865.44,2666.85 2887.24,2666.85 C22.2@2893.14,2669.81 2895.8,2667.15 2932.77,2667.15 2933.16,2666.75 U3.48@2933.16,2659.02 ; U8.4@2572.63,2485.96 2572.63,2363.61 2579.55,2356.69 2760.75,2356.69 2760.75,2317.97 L1.1@2761.64,2317.08 ; L1.1@2761.64,2323.56 L1.1@2761.64,2317.08 ; L1.1@2764.67,2314.04 L1.1@2761.64,2317.08 ; L1.1@2765.4,2317.25 2765.4,2166.77 2768.35,2163.82 C27.1@2770.91,2163.82 ; C27.1@2776.38,2162.48 2833.44,2162.48 2840.36,2169.4 U9.24@2840.36,2230.93 ; C12.1@3535.23,2108.06 3574.3,2108.06 3578.34,2112.1 U6.5@3582.28,2112.1 ; C12.1@3537.58,2122.26 3546.44,2131.12 3546.44,2142.91 3546.48,2142.96 C13.1@3546.48,2168.48 ; C13.1@3544.53,2170.43 C13.1@3538.57,2176.39 C13.1@3545.17,2183
  other v1: 3538.27,2092.46 2733.07,2315.67 3771.74,2376.23 3220.68,2648.34
5V: C9.1 C11.1 C15.2 C24.2 C25.2 C26.1 C53.1 C54.1 R32.2 U4.3 U5.1 U5.3 U6.1 U6.3 U7.4 U9.1 U16.1 | length 285.4
  Top Layer w11.81: C26.1@2776.92,2054.49 2833.44,2054.49 2840.36,2047.57 U9.1@2840.36,1992.93 ; C15.2@3261.32,2001.78 3264.28,1998.82 U4.3@3331.89,1998.82 ; U7.4@3868.9,1534.17 U7.4@3869.09,1534.37 ; U7.4@3875.98,1534.37 C25.2@3919.32,1534.37 ; C25.2@3919.32,1533.55 3921.75,1533.55 3924.7,1530.59 3924.7,1492.42 C24.2@3921.66,1489.37
  other v1: 3945.48,1487.72 3814.94,1995.13 3284.23,2012.04 2749,2055.97
-5V: C18.1 C33.1 R9.1 U4.6 U11.22 | length 378.6
  Top Layer w7.87: U11.22@3046.06,1850.22 3046.06,1863.82 C33.1@3074.14,1893.23 ; C33.1@3075.76,1901.47 3323.66,1901.47 C18.1@3326.8,1904.61 3329.92,1901.48 3352.75,1901.48 R9.1@3355.75,1904.47 ; C18.1@3328.49,1904.47 3330.46,1906.44 3330.46,1938.12 3332.03,1939.69 U4.6@3335.84,1939.69
\: R24.1@3267.74,2398.7 U3.26 | length 58.7
  Top Layer w7.87: U3.26@3211.76,2401.72 R24.1@3267.74,2401.72 ; R24.1@3265.83,2396.8 R24.1@3267.74,2398.7
CH340_XI: C6.1 U1.8 U2.1 | length 123
  Top Layer w7.87: U2.1@3352.48,2618.67 3362.78,2608.37 3362.78,2557.75 C6.1@3361.02,2555.99 ; U1.8@3361.22,2493.25 3362.11,2494.14 C6.1@3362.11,2548.21
CH340_XO: C7.1 U1.7 U2.3 | length 216.2
  Top Layer w7.87: C7.1@3406.44,2555.15 3403.45,2558.13 3403.45,2661.3 3408.06,2665.91 3419.41,2665.91 U2.3@3439.1,2685.6 ; C7.1@3408.41,2555.15 3408.41,2496.06 U1.7@3411.22,2493.25
DA_EN: U3.25 U7.5 | length 48.5
  Top Layer w7.87: v1(3211.42,2364.88) 3211.42,2380.56 3212.87,2382.02 U3.25@3223.02,2382.02
  Top Layer w15.75: v1(3868.18,1629.29) 3868.18,1609.69 U7.5@3868.9,1608.97
DCIN: C4.2 C5.2 C52.2 D1.1 D3.1 U16.4 U16.5 U16.6
DPDT_CTL2: R25.1@3267.78,2424.21 U3.27 | length 56
  Top Layer w7.87: U3.27@3211.76,2421.42 R25.1@3267.78,2421.42
EN-: U3.20 U4.8 | length 69.1
  Top Layer w7.87: U4.8@3409.84,1959.37 3410.89,1958.31 3431.16,1958.31 v1(3432.21,1957.25)
  Top Layer w11.81: U3.20@3071.56,2321.02 3071.61,2321.06 3071.61,2366.8 v1(3071.65,2366.85)